# Altium PCB Phaser.PcbDoc (part 16 of 16)
Units mm, origin at the board's own origin, x right, y up, seen from the top; angles counter-clockwise.
Board outline 161.99 x 100 mm, 6 copper layers (TopLayer, MidLayer1, MidLayer2, SignalLayer1, Internal Plane 1, BottomLayer), stack 1.528 mm thick; 1017 components, 665 nets, 3453 pads, 2223 vias.
Unrouted connection lines stored in the file: 1.
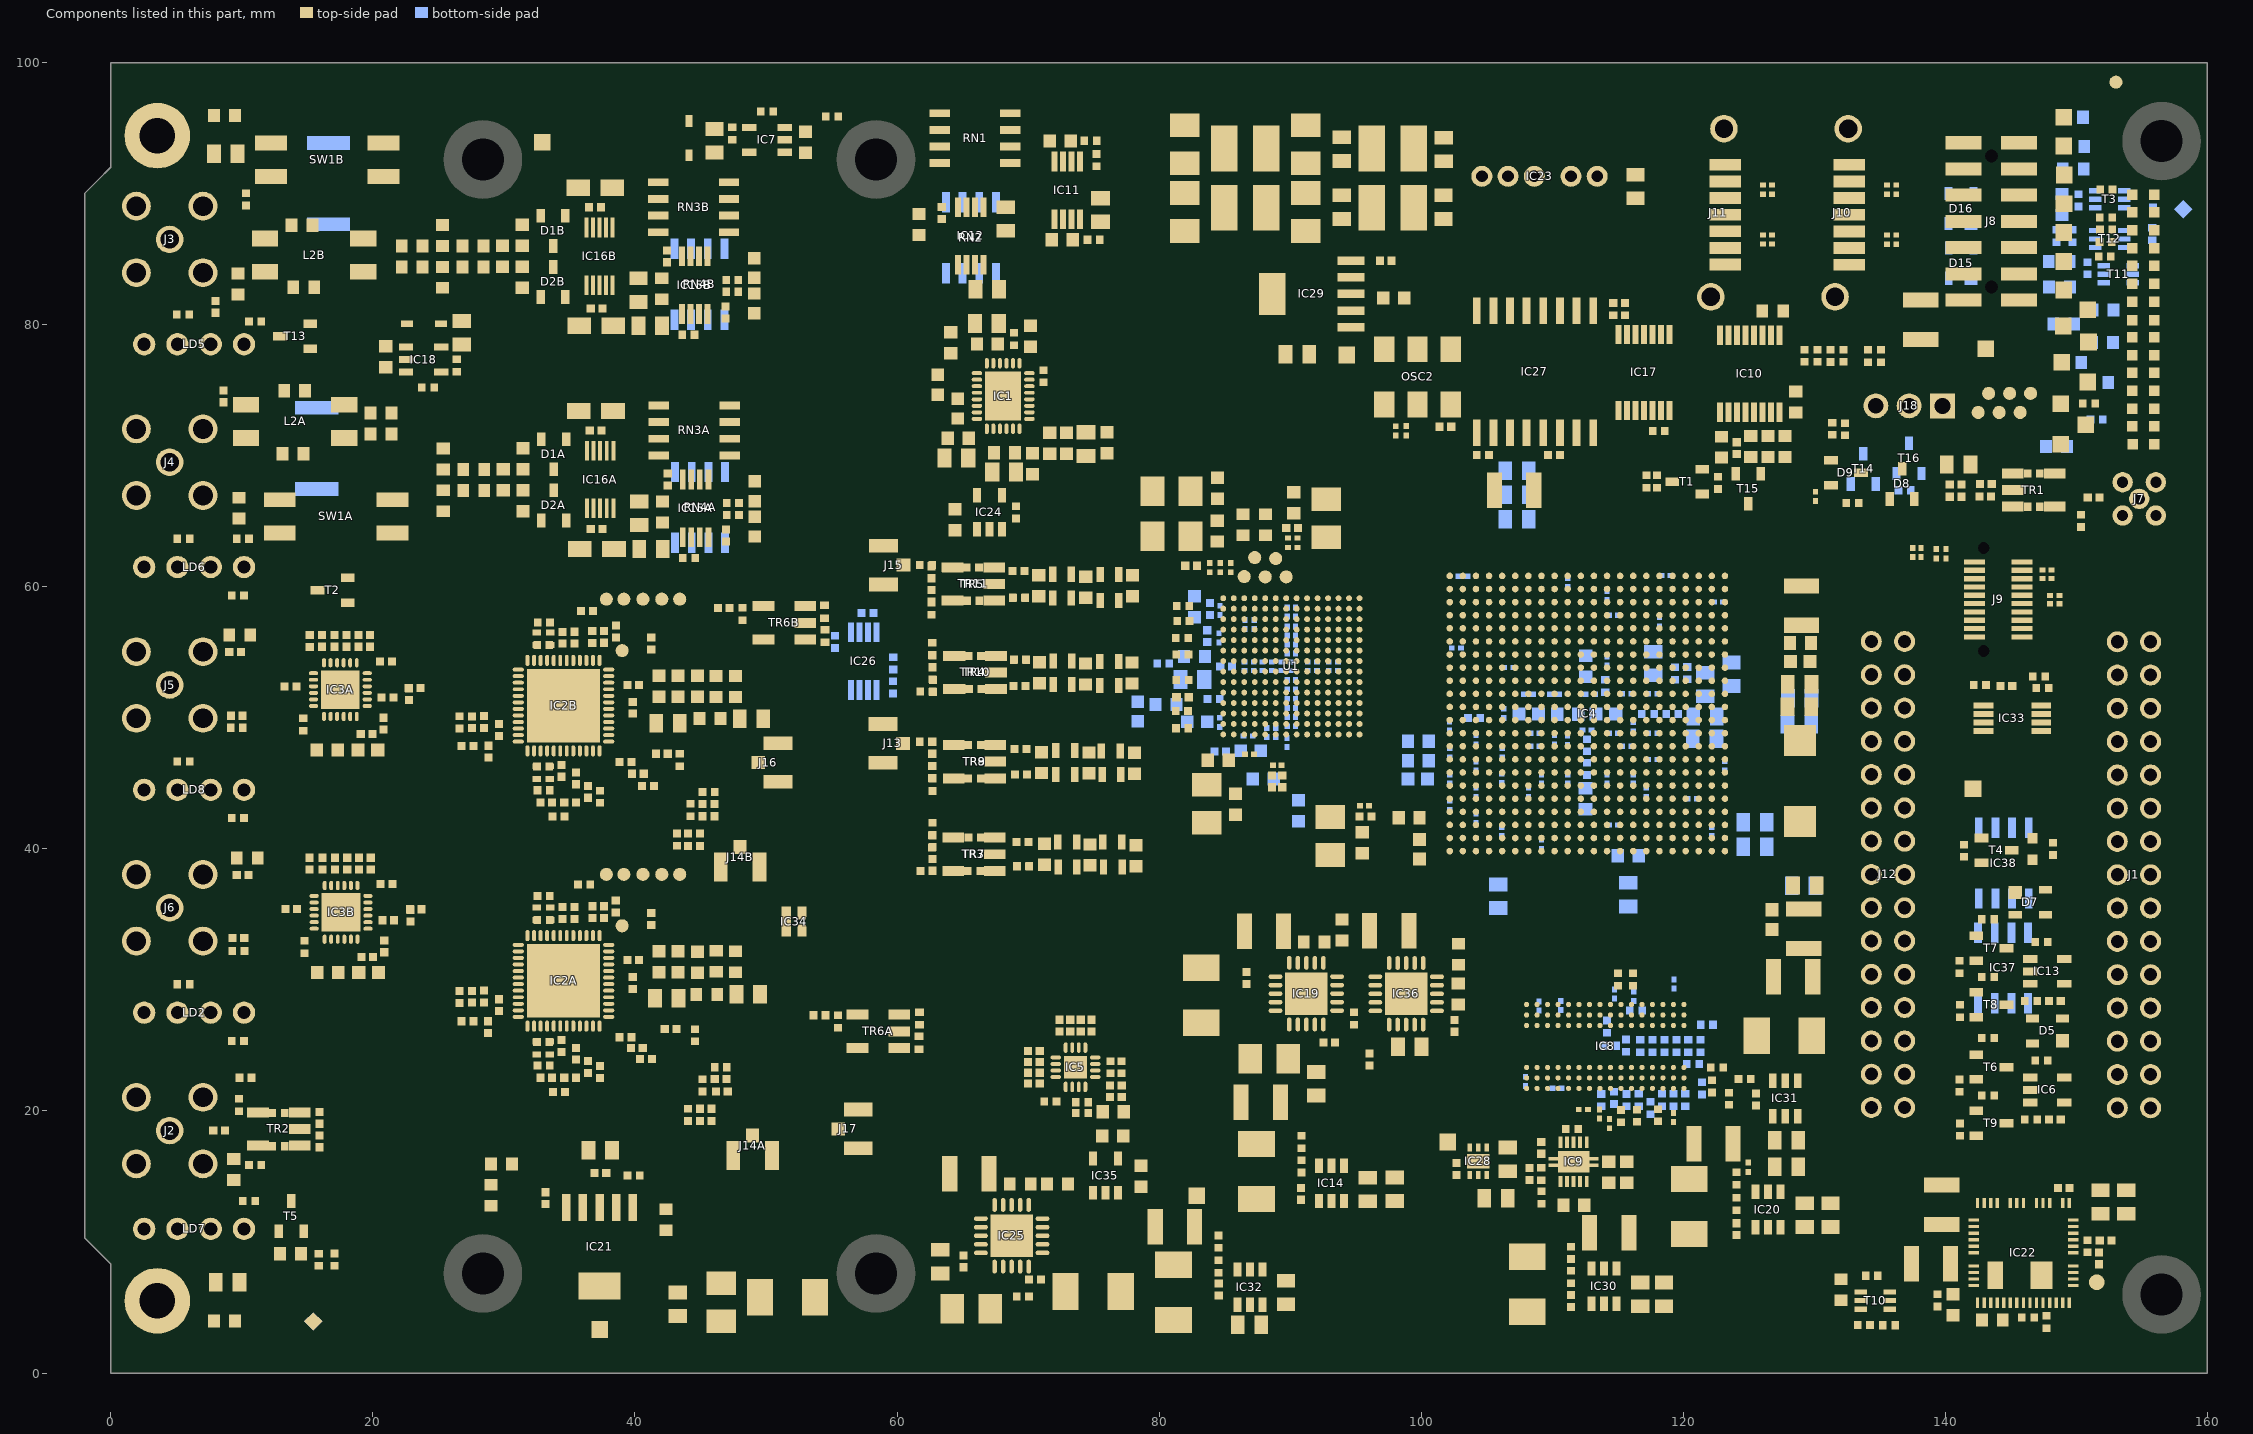
[diagram p18: the components of this part, seen from the top]

## Polygon pours and split planes (outlines as drawn) (continued)
IOVDD33 on MidLayer2 "IOVDD33_L03_P093" (solid, remove dead copper, pour order 93): 21 vertices, not listed, extent 91.386,44.427 95.041,57.648
P1V2D on MidLayer2 "P1V2D_L03_P092" (solid, remove dead copper, pour order 92): 27 vertices, not listed, extent 90.011,42.948 94.269,57.543
MGTAVCC on MidLayer2 "MGTAVCC_L03_P098" (solid, remove dead copper, pour order 98): 103.848,44.142 104.909,44.142 105.442,44.675 106.036,44.675 107.166,45.805 107.166,47.703 106.926,47.943 105.597,47.943 104.342,49.198 101.105,49.198 100.9,48.994 100.9,47.091
VCCAUX on MidLayer2 "VCCAUX_L03_P116" (solid, remove dead copper, pour order 116): 108.006,51.49 108.006,50.501 108.393,50.114 114.992,50.114 115.527,50.649 115.802,50.649 116.006,50.445 116.006,49.535 116.548,48.994 117.09,48.994 117.47,49.374 117.47,50.303 115.978,51.795 108.312,51.795
REF_P1V7066 on MidLayer2 "REF_P1V7066_L03_P069" (solid, remove dead copper, pour order 69): 17 vertices, not listed, extent 41.92,65.173 65.206,93.208
N11V5A on MidLayer2 "N11V5A_L03_P065" (solid, remove dead copper, pour order 65): 17 vertices, not listed, extent 30.836,62.301 39.675,87.657
P3V3A on BottomLayer "P3V3A_L06_P030" (solid, remove dead copper, pour order 30): 47 vertices, not listed, extent 35.673,17.272 66.802,58.377
no net on BottomLayer "BAL_BOT" (solid, pour order 147): 2.4,98.525 158.448,98.525 158.448,3.023 6.706,3.023 6.629,3.099 4.318,5.41 4.318,8.179 -0.5,8.179 -0.155,89.368 2.4,91.923
GND on BottomLayer "L6-GND" (solid, remove dead copper, pour order 171): 53.604,40.767 53.604,17.885 6.66,17.885 6.66,40.767
GND on BottomLayer "L6-GND" (solid, remove dead copper, pour order 153): 53.667,62.355 53.667,41.859 6.66,41.859 6.66,62.355
P3V3 on BottomLayer "P3V3_L06_P107" (solid, remove dead copper, pour order 107): 125.695,39.296 125.695,43.799 123.405,46.089 121.786,46.089 121.675,45.978 121.675,45.325 121.099,44.749 119.789,44.749 119.375,44.335 119.375,43.106 121.004,41.476 123.002,41.476 123.002,39.479 123.353,39.128 125.527,39.128
GND on BottomLayer "GND_L06_P136" (solid, remove dead copper, pour order 136): 18 vertices, not listed, extent 83.073,46.802 92.896,61.497
P1V2A on BottomLayer "P1V2A_L06_P134" (solid, remove dead copper, pour order 134): 43 vertices, not listed, extent 87.367,48.37 90.106,57.325
P12V0A on BottomLayer "P12V0A_L06_P057" (solid, remove dead copper, pour order 57): 51.75,97 51.75,91.75 52.5,91 58.05,91 61.05,94 76.25,94 78.35,91.9 80.05,91.9 80.625,92.475 80.625,97.001 80.627,97.003
P1V0 on BottomLayer "P1V0_L06_P102" (solid, remove dead copper, pour order 102): 121.675,51.075 121.675,48.045 122.267,47.453 127.128,47.453 128.924,49.249 128.924,52.744 127.868,53.8 125.62,53.8 124.878,53.058 124.878,51.93 124.024,51.075
MGTAVTT on BottomLayer "MGTAVTT_L06_P099" (solid, remove dead copper, pour order 99): 19 vertices, not listed, extent 99.101,41.203 104.7,50.18
AVDD33 on BottomLayer "AVDD33_L06_P135" (solid, remove dead copper, pour order 135): 37 vertices, not listed, extent 86.391,48.991 88.434,57.444
P12V0 on BottomLayer "P12V0_L06_P114" (solid, remove dead copper, pour order 114): 151.439,23.653 151.439,16.369 153.279,14.529 159.004,14.529 159.004,24.056 159,24.472 152.258,24.472
VTT_DDR3 on BottomLayer "VTT_DDR3_L06_P094" (solid, remove dead copper, pour order 94): 29 vertices, not listed, extent 113.215,17.203 123.012,26.991
N12V0A on BottomLayer "N12V0A_L06_P081" (solid, remove dead copper, pour order 81): 78.35,90.344 80.05,90.344 80.625,89.769 80.625,85.557 68.778,73.711 20.577,73.711 19.586,74.702 19.586,77.015 20.142,77.572 67.037,77.572 77.85,88.385 77.85,89.844
NetC30B_2 on BottomLayer "NETC30B_2_L06_P066" (solid, remove dead copper, pour order 66): 44.196,44.755 43.627,44.186 43.627,39.311 43.787,39.152 44.281,39.152 44.898,39.769 44.898,44.111 44.898,44.535 44.679,44.755
NetC30A_2 on BottomLayer "NETC30A_2_L06_P038" (solid, remove dead copper, pour order 38): 45.121,23.755 44.552,23.186 44.552,18.311 44.712,18.152 45.206,18.152 45.823,18.769 45.823,23.111 45.823,23.535 45.604,23.755
P11V5A on BottomLayer "P11V5A_L06_P138" (solid, remove dead copper, pour order 138): 17 vertices, not listed, extent 37.832,61.677 47.32,73
P1V2D on BottomLayer "P1V2D_L06_P129" (solid, remove dead copper, pour order 129): 32 vertices, not listed, extent 90.084,50.466 93.252,57.381
IOVDD33 on BottomLayer "IOVDD33_L06_P088" (solid, remove dead copper, pour order 88): 94.227,43.019 94.545,43.337 94.545,44.845 93.964,45.426 90.748,45.426 89.877,44.556 89.877,43.287 90.145,43.019
GND on BottomLayer "GND_L06_P112" (solid, remove dead copper, pour order 112): 107.047,70.05 104.938,70.05 103.944,69.056 103.944,65.956 105.409,64.491 107.155,64.491 107.293,64.628 107.293,70.02 107.263,70.05 107.197,70.05
P2V5 on BottomLayer "P2V5_L06_P111" (solid, remove dead copper, pour order 111): 107.122,64.799 107.43,64.491 109.506,64.491 111.062,66.048 111.062,70.01 110.4,70.673 107.945,70.673 107.122,69.849
P5V5 on BottomLayer "P5V5_L06_P056" (solid, remove dead copper, pour order 56): 119.886,2.8 118.074,2.8 117.377,2.103 58.878,2.103 58.875,4.625 ccw(c58.417,7.566) 60.775,5.75 97.775,5.75 99.325,7.3 117.7,7.3 119.886,5.114
VCCAUX on BottomLayer "VCCAUX_L06_P110" (solid, remove dead copper, pour order 110): 125.875,36.132 126.34,35.667 128.48,35.667 129.091,36.278 129.091,37.988 128.625,38.453 126.515,38.453 125.875,37.813
no net on SignalLayer1 "ML1_BAL" (solid, pour order 170): 6.096,98.355 158.596,98.355 158.655,3.1 66.15,3.1 6.096,3.1 6.096,8.103 2.897,8.103 -0.2,11.2 -0.2,78.7 2.3,81.2 2.3,91.923 6.096,91.923
P12V0 on SignalLayer1 "P12V0_L04_P130" (solid, remove dead copper, pour order 130): 151.439,23.653 151.439,16.369 153.279,14.529 159.004,14.529 159.004,24.056 159,24.472 152.258,24.472
REF_P2V048 on SignalLayer1 "REF_P2V048_L04_P152" (solid, remove dead copper, pour order 152): 17 vertices, not listed, extent 45.275,61.57 64.465,83.112
P5V0A on SignalLayer1 "P5V0A_L04_P149" (solid, remove dead copper, pour order 149): 25.705,62.843 25.705,59.224 26.988,57.941 29.723,57.941 35.459,63.677 47.43,63.677 55.774,72.021 55.781,74.377 54.866,75.295 50.444,75.295 44.577,69.427 32.289,69.427
NetC330_2 on SignalLayer1 "NETC330_2_L04_P133" (solid, remove dead copper, pour order 133): 151.825,10.225 147.65,10.225 144.425,13.45 144.425,14.475 144.45,14.475 144.775,14.8 144.8,14.775 146.126,14.775 148.876,12.025 151.55,12.025 152.15,11.425 152.15,10.55
P12V0A on SignalLayer1 "P12V0A_L04_P139" (solid, remove dead copper, pour order 139): 51.75,97 51.75,91.75 52.5,91 58.05,91 61.05,94 76.25,94 78.35,91.9 80.05,91.9 80.625,92.475 80.625,97.001 80.627,97.003
P1V2 on SignalLayer1 "P1V2_L04_P109" (solid, remove dead copper, pour order 109): 17 vertices, not listed, extent 98.967,17.688 107.478,39.975
GND on MidLayer1 "GND_L02_P108" (solid, remove dead copper, pour order 108): 0,100 0,92 -2,90 -2,10.325 0,8.325 0,0 160,0 160,100
VCCAUX on MidLayer1 "VCCAUX_L02_P106" (solid, remove dead copper, pour order 106): 19 vertices, not listed, extent 106.993,34.22 127.85,51.994
P1V5 on MidLayer1 "P1V5_L02_P091" (solid, remove dead copper, pour order 91): 81.966,20.064 85.218,16.812 118.586,16.812 122.675,20.901 122.675,38.795 115.768,45.701 107.051,45.701 104.151,42.801 101.583,42.801 100.9,42.118 100.9,35.039 97.464,31.603 87.305,31.603 81.966,26.264
VCCBRAM on MidLayer1 "VCCBRAM_L02_P078" (solid, remove dead copper, pour order 78): 109.715,49.946 109.357,49.588 109.357,48.923 109.7,48.58 124.061,48.58 129.738,54.257 129.738,58.207 129.321,58.624 127.912,58.624 127.463,58.194 127.464,55.24 122.17,49.946
AVDD33 on MidLayer1 "AVDD33_L02_P082" (solid, remove dead copper, pour order 82): 89.097,61.152 87.134,63.114 84.74,63.114 84.247,62.622 84.247,61.643 85.909,59.981 85.909,50.398 88.497,50.398 89.097,50.998
P1V8 on MidLayer1 "P1V8_L02_P105" (solid, remove dead copper, pour order 105): 122.93,33.965 122.93,20.794 118.634,16.498 118.634,15.573 119.086,15.12 123.056,15.12 127.85,19.915 127.85,33.965
GND on Internal Plane 1 (split plane): 19 vertices, not listed, extent -1.49,0.51 159.484,99.489

## Keep-outs
BottomLayer:
  lines w0.203: 6.404,2.715 6.404,8.382 ; 6.404,91.542 6.404,97.209
Keep-Out Layer:
  drawing of 3496 lines, arcs and shapes, not listed

## Other copper
TopLayer:
  rectangle net BBIA_N: 33.249,24.816 33.452,25.07
  rectangle net BBIA_P: 32.614,24.841 32.791,25.07
  rectangle net BBQA_N: 33.35,34.773 33.477,35.001
  rectangle net BBQA_P: 32.639,34.798 32.791,35.001
  rectangle net BBIB_N: 33.249,45.847 33.452,46.076
  rectangle net BBIB_P: 32.614,45.847 32.791,46.076
  rectangle net BBQB_N: 33.172,55.728 33.477,55.982
  rectangle net BBQB_P: 32.664,55.753 32.842,55.982
  rectangle net P1V8A: 73.725,15.5 74.918,18.789
  rectangle net P3V3: 74.154,12.78 75.2,13.638
  rectangle net P3V3: 72.274,11.366 74.328,13.136
  rectangle net P1V8A: 72.168,17.425 74.655,18.786
  rectangle net P1V8A: 70.303,15.651 72.689,18.789
  rectangle net hs: 76.429,15.492 77.869,17.302
  rectangle net SG1: 7.393,82.364 8.006,82.994
  rectangle net SG4: 7.296,39.014 8.359,39.814
  rectangle net SG1: 7.425,90.03 8.255,90.649
  rectangle net GND: 84.172,80.43 90.027,84.054
  rectangle net GND: 141.825,6.075 142.45,6.637
  rectangle net GND: 91.735,13.402 92.477,14.32
  rectangle net GND: 125.875,18.744 126.663,19.914
  rectangle net REF_P2V048: 63.625,81.38 64.391,83.005
  rectangle net P1V2A: 85.404,40.582 86.206,42.184
  region net CK_MMCX_IN_P: 146.265,68.961 145.796,68.961 145.796,68.342 146.265,68.342
  rectangle net NetC190_2: 147.202,68.335 147.671,68.954
  rectangle net NetJ7_2: 147.202,65.795 147.671,66.414
  region net CK_MMCX_IN_N: 146.268,66.418 145.799,66.418 145.799,65.799 146.268,65.799
  rectangle net CK_SMA_IN_P: 13.265,16.99 13.734,17.609
  region net NetC196_2: 12.335,17.609 11.866,17.609 11.866,16.99 12.335,16.99
  region net SG0: 12.335,20.154 11.866,20.154 11.866,19.535 12.335,19.535
  rectangle net CK_SMA_IN_N: 13.265,19.535 13.734,20.154
  rectangle net DAC_OUTD_P: 66.248,61.158 66.717,61.777
  rectangle net DAC_OUTD_N: 66.273,58.618 66.742,59.237
  region net NetC382_1: 65.406,38.625 64.937,38.625 64.937,38.006 65.406,38.006
  rectangle net DAC_OUTA_P: 66.336,38.006 66.804,38.625
  rectangle net DAC_OUTA_N: 66.387,40.546 66.855,41.165
  region net NetC383_1: 65.457,41.165 64.988,41.165 64.988,40.546 65.457,40.546
  region net NetC385_1: 65.447,45.687 64.978,45.687 64.978,45.068 65.447,45.068
  rectangle net DAC_OUTB_N: 66.377,45.068 66.846,45.687
  region net NetC384_1: 65.447,48.227 64.978,48.227 64.978,47.608 65.447,47.608
  rectangle net DAC_OUTB_P: 66.377,47.608 66.846,48.227
  region net NetC386_1: 65.498,52.494 65.029,52.494 65.029,51.875 65.498,51.875
  region net NetC387_1: 65.473,55.034 65.004,55.034 65.004,54.415 65.473,54.415
  rectangle net DAC_OUTC_N: 66.403,54.415 66.871,55.034
  pour cut-out: 47.533,41.637 47.641,41.529 48.598,41.529 48.598,38.906 47.548,38.906
  pour cut-out: 48.652,18.785 48.662,18.774 49.423,18.774 49.423,16.188 49.459,16.152 48.667,16.152
BottomLayer:
  rectangle net P1V2D: 90.727,55.946 90.854,56.079
  rectangle net P1V2D: 90.727,51.696 90.893,51.85

## Silkscreen, mask and mechanical layers (free items; w line width, h text height)
TopOverlay:
  drawing of 1298 lines, arcs and shapes, not listed
  text "JTAG" at 140.665,97.511 h1.52
  text "G" at 8.255,96.647 h1.02
  text "Off" at 11.025,96.644 h1
  text "On" at 19.488,96.595 h1
  text "P1V0" at 150.162,95.36 h0.9
  text "GND" at 31.53,95.352 h1
  text "P1V2" at 150.19,93.294 h0.9
  text "P1V2A" at 150.292,91.008 h0.9
  text "1V0" at 156.566,89.459 h0.8
  text "P1V5" at 150.241,88.824 h0.9
  text "1V2" at 156.595,88.186 h0.8
  text "1V2A" at 156.563,86.785 h0.8
  text "ADC IN 0" at 9.585,85.505 h0.76 r90
  text "P1V8" at 151.155,85.471 h0.9 r90
  text "P1V5" at 156.515,85.396 h0.9
  text "P1V8" at 156.464,83.972 h0.9
  text "P2V5" at 150.135,83.855 h0.8
  text "P2V5" at 156.575,82.656 h0.8
  text "3V3M" at 150.19,82.296 h0.9
  text "3V3M" at 156.489,81.305 h0.9
  text "G" at 8.491,80.104 h1.02
  text "3V3A" at 156.489,79.934 h0.9
  text "ASSY" at 133.431,79.067 h0.76
  text "HW_REV" at 128.581,78.992 h0.76
  text "P3V3" at 156.489,78.562 h0.9
  text "GND" at 144.432,77.674 h1
  text "P3V6" at 156.489,77.216 h0.9
  text "FAN" at 136.75,76.962 h1
  text "5V0A" at 156.489,75.921 h0.9
  text "TP2" at 144.509,75.615 h1
  text "GND" at 93.103,75.541 h1
  text "TP4" at 141.44,75.513 h1
  text "ADC IN 1" at 1.015,74.525 h0.76
  text "P5V5" at 156.515,74.447 h0.9
  text "12V0" at 156.515,73.127 h0.9
  text "Phaser v1.1.2" at 77.387,72.838 h1.5
  text "11V5" at 156.566,71.806 h0.9
  text "TP0" at 147.713,71.438 h1 r90
  text "WUT ISE 2022" at 79.537,70.338 h1.02
  text "TP5" at 142.948,69.892 h1 r90
  text "TP3" at 144.608,69.892 h1 r90
  text "TP1" at 146.194,69.892 h1 r90
  text "T + G" at 134.357,69.56 h1
  text "N11V5" at 153.467,69.164 h0.9
  text "INT CLK IN" at 150.927,63.754 h0.76
  text "SDIO" at 98.231,63.275 h1 r90
  text "TXENA" at 99.729,63.275 h1 r90
  text "G" at 7.221,63.074 h1.02
  text "EEM 1" at 130.592,61.376 h1.52
  text "EEM 0" at 150.9,61.356 h1.52
  text "On" at 20.5,60.413 h1
  text "Off" at 12.121,60.301 h1
  text "LD" at 35.8,60.326 h1
  text "PS" at 38.4,60.326 h1
  text "DAC OUT D" at 53.274,59.43 h1
  text "RDBK" at 32.788,58.785 h1
  text "SDO" at 97.48,58.387 h1 r90
  text "SCLK" at 100.564,57.402 h1 r90
  text "SDENB" at 98.998,56.39 h1 r90
  text "G" at 11.821,55.671 h1.02
  text "CLK" at 42.975,54.354 h1 r90
  text "DATA" at 44.575,54.354 h1 r90
  text "LE" at 46.225,54.354 h1 r90
  text "RF OUT 0" at 8.314,52.86 h0.76
  text "DAC OUT B" at 53.273,45.933 h1
  text "GND" at 143.866,44.069 h1
  text "FPGA_DONE" at 141.834,41.935 h0.9
  text "EXT  / VCO" at 49.542,41.331 h1
  text "LD" at 36.068,39.27 h1
  text "PS" at 38.546,39.27 h1
  text "G" at 11.984,38.632 h1.02
  text "RDBK" at 32.787,37.785 h1
  text "LO OUT N" at 50.337,36.561 h1
  text "RF OUT 1" at 8.57,36.046 h0.76
  text "CLK" at 42.975,33.354 h1 r90
  text "DATA" at 44.575,33.354 h1 r90
  text "LE" at 46.225,33.354 h1 r90
  text "EXT CLK IN" at 6.825,23.55 h0.76
  text "GND" at 98.025,17.128 h1
  text "GND" at 81.36,14.697 h1
  text "LO OUT P" at 53.252,14.52 h1
  text "G" at 9.05,14.5 h1.02
  text "LO OUT N" at 45.315,12.175 h1
  text "G" at 10.628,3.321 h1.02
  text "GND" at 33.075,2.792 h1
BottomOverlay:
  drawing of 1237 lines, arcs and shapes, not listed
  text "Phaser v1.1.2" at 93.671,72.632 h1.5
  text "WUT ISE 2022" at 90.941,70.279 h1.02
BottomSolder:
  rectangle: 31.958,48.26 37.089,53.474
  rectangle: 32.084,27.424 37.216,32.638
  rectangle: 31.959,27.299 37.091,32.513
Mechanical 1:
  drawing of 409 lines, arcs and shapes, not listed
  text "Layer" at 7.941,154.414 h1.52
  text "Name" at 18.352,154.414 h1.52
  text "Material" at 44.253,154.414 h1.52
  text "Thickness" at 66.091,154.414 h1.52
  text "Constant" at 82.597,154.414 h1.52
  text "Board Layer Stack" at 97.072,154.414 h1.52
  text "TopOverlay" at 18.352,151.366 h1.52
  text "TopSolder" at 18.352,148.318 h1.52
  text "Solder Resist" at 44.253,148.318 h1.52
  text "0,022mm" at 66.091,148.318 h1.52
  text "3.5" at 82.597,148.318 h1.52
  text "1" at 7.941,145.27 h1.52
  text "TopLayer" at 18.352,145.27 h1.52
  text "0,053mm" at 66.091,145.27 h1.52
  text "Dielectric1" at 18.352,142.222 h1.52
  text "FR-4" at 44.253,142.222 h1.52
  text "0,110mm" at 66.091,142.222 h1.52
  text "4.2" at 82.597,142.222 h1.52
  text "2" at 7.941,139.174 h1.52
  text "MidLayer1" at 18.352,139.174 h1.52
  text "0,018mm" at 66.091,139.174 h1.52
  text "Dielectric2" at 18.352,136.126 h1.52
  text "FR-4" at 44.253,136.126 h1.52
  text "0,200mm" at 66.091,136.126 h1.52
  text "4.2" at 82.597,136.126 h1.52
  text "3" at 7.941,133.078 h1.52
  text "MidLayer2" at 18.352,133.078 h1.52
  text "0,018mm" at 66.091,133.078 h1.52
  text "Dielectric3" at 18.352,130.03 h1.52
  text "FR-4" at 44.253,130.03 h1.52
  text "0,730mm" at 66.091,130.03 h1.52
  text "4.2" at 82.597,130.03 h1.52
  text "4" at 7.941,126.982 h1.52
  text "SignalLayer1" at 18.352,126.982 h1.52
  text "0,018mm" at 66.091,126.982 h1.52
  text "Dielectric4" at 18.352,123.934 h1.52
  text "FR-4" at 44.253,123.934 h1.52
  text "0,200mm" at 66.091,123.934 h1.52
  text "4.2" at 82.597,123.934 h1.52
  text "5" at 7.941,120.886 h1.52
  text "Internal Plane 1" at 18.352,120.886 h1.52
  text "0,018mm" at 66.091,120.886 h1.52
  text "Dielectric5" at 18.352,117.838 h1.52
  text "FR-4" at 44.253,117.838 h1.52
  text "0,110mm" at 66.091,117.838 h1.52
  text "4.2" at 82.597,117.838 h1.52
  text "6" at 7.941,114.79 h1.52
  text "BottomLayer" at 18.352,114.79 h1.52
  text "0,053mm" at 66.091,114.79 h1.52
  text "BottomSolder" at 18.352,111.742 h1.52
  text "Solder Resist" at 44.253,111.742 h1.52
  text "0,022mm" at 66.091,111.742 h1.52
  text "3.5" at 82.597,111.742 h1.52
  text "BottomOverlay" at 18.352,108.694 h1.52
Mechanical 2:
  lines w0.1: -2.544,-14.238 -2.544,108.444
SHIELD:
  lines w1: 10.1,4.4 10.1,4.9
Mechanical 13:
  lines w0.01: -3.35,-0.784 -3.35,80.924

## Text inside footprints (layer, text, board x,y; h text height)
IC8: Mechanical 14 "L" at 116.241,20.32 h0.4 r90; Mechanical 14 "K" at 115.441,20.32 h0.4 r90; Mechanical 14 "M" at 117.041,20.32 h0.4 r90; Mechanical 14 "H" at 113.841,20.32 h0.4 r90; Mechanical 14 "G" at 113.041,20.32 h0.4 r90; Mechanical 14 "F" at 112.241,20.32 h0.4 r90; Mechanical 14 "E" at 111.441,20.32 h0.4 r90; Mechanical 14 "D" at 110.641,20.32 h0.4 r90; Mechanical 14 "C" at 109.841,20.32 h0.4 r90; Mechanical 14 "B" at 109.041,20.32 h0.4 r90; Mechanical 14 "N" at 117.841,20.32 h0.4 r90; Mechanical 14 "P" at 118.641,20.32 h0.4 r90; Mechanical 14 "R" at 119.441,20.32 h0.4 r90; Mechanical 14 "J" at 114.641,20.32 h0.4 r90; Mechanical 14 "T" at 120.241,20.32 h0.4 r90; Mechanical 14 "1" at 106.766,21.595 h0.4 r90; Mechanical 14 "2" at 106.766,22.395 h0.4 r90; Mechanical 14 "3" at 106.766,23.195 h0.4 r90; Mechanical 14 "7" at 106.766,26.395 h0.4 r90; Mechanical 14 "8" at 106.766,27.195 h0.4 r90; Mechanical 14 "9" at 106.766,27.995 h0.4 r90
J1: TopOverlay "30" at 157.051,20.873 h1.02 r270; Mechanical 14 "30" at 157.051,20.873 h1.02 r270
J12: TopOverlay "30" at 138.281,20.899 h1.02 r270; Mechanical 14 "30" at 138.281,20.899 h1.02 r270
J18: TopOverlay "1" at 139.978,72.4 h1 r180; Mechanical 14 "1" at 139.978,72.4 h1 r180
SW1A: TopOverlay "1" at 11.338,67.859 h1; Mechanical 14 "1" at 11.339,67.864 h1
SW1B: TopOverlay "1" at 10.665,95.078 h1; Mechanical 14 "1" at 10.666,95.083 h1